# Altium PCB power_model.PcbDoc (part 2 of 2)
Units mm, origin at the board's own origin, x right, y up, seen from the top; angles counter-clockwise.
Board outline 133.22 x 76.2 mm, 2 copper layers (Top Layer, Bottom Layer); 223 components, 133 nets, 558 pads, 66 vias.
Unrouted connection lines stored in the file: 2.
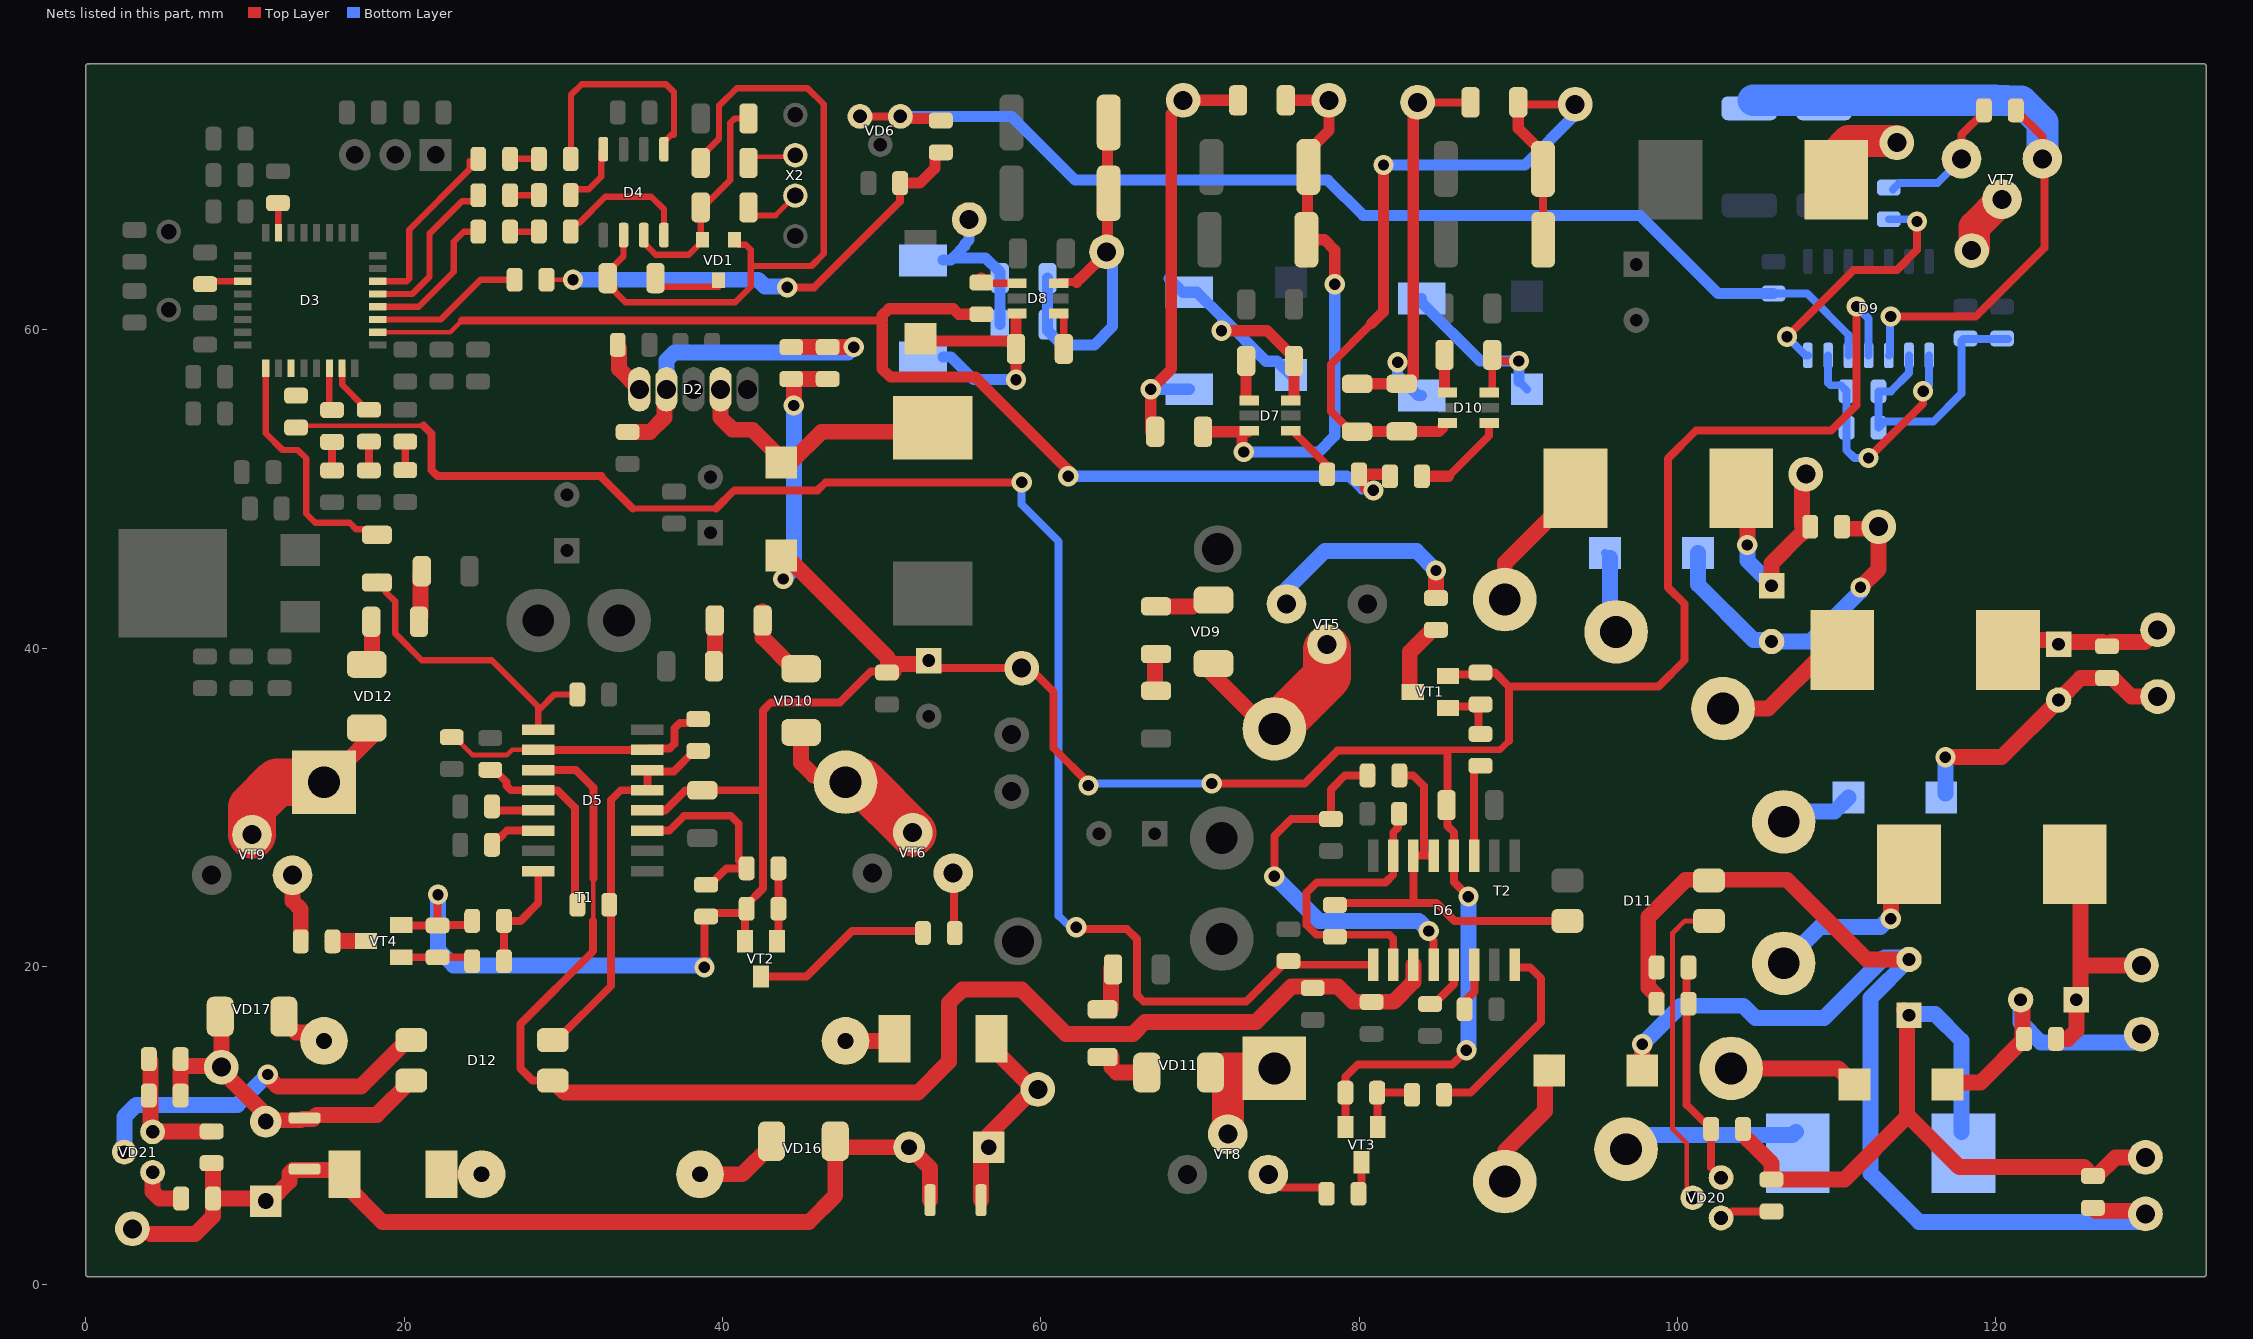
[diagram p2: the nets of this part, all layers, seen from the top]

## Via types
v1: diameter 1.27, hole 0.711, Top Layer to Bottom Layer, 63 vias
v2: diameter 1, hole 0.5, Top Layer to Bottom Layer, 3 vias

## Nets (pads, with @x,y where several pads share a name; then routed paths per layer and width w, separated by ;. In a path a pad name is that pad's centre, name@x,y a point inside that pad or via, vN(x,y) a via of type N, cw(c..) or ccw(c..) an arc to the next point about the centre after c; other vN are vias at no path point) (continued)
NetC15_1: C15.1 C21.2 C30.1 C31.1 D5.12 D6.12 D9.4 R13.2 R14.2 R43.2 R45.2 R46.2 R47.2 R48.2 R49.2 VD2.2 VT1.2 VT2.2 VT3.2 VT4.2 XT3.1 | length 223.4
  Top Layer w0.254: 42.466,31.067 42.545,30.988 ; VD2.2@43.688,45.822 43.688,44.466 v1(43.815,44.339) ; R14.2@44.323,56.912 R14.2@44.482,56.753 ; XT3.1@58.801,38.735 XT3.1@59.323,38.735 ; v1@62.941,31.667 v1@62.992,31.616 ; v1(62.992,31.369) v1@62.992,31.529 ; R48.2@79.137,12.065 R48.2@79.157,12.085 ; v1@62.992,31.529 63.025,31.496 63.112,31.496 v1@62.992,31.616 ; v1@62.992,31.529 v1@62.992,31.616
  Top Layer w0.3: v1@70.739,31.242 v1@70.993,31.496 ; VT1.2@85.619,38.148 85.725,38.148 VT1.2@85.931,38.354
  Top Layer w0.4: 85.558,33.607 88.852,33.607 89.408,34.163
  Top Layer w0.5: VT4.2@19.812,22.606 19.844,22.574 R49.2@22.098,22.574 ; v1(22.122,24.511) 22.098,24.487 22.098,22.606 24.019,22.606 R45.2@24.273,22.86 ; D5.12@35.282,29.797 36.401,29.797 37.671,31.067 C30.1@38.735,31.067 42.466,31.067 ; v1(38.862,19.939) 38.862,23.019 R43.2@38.973,23.13 39.211,23.368 41.106,23.368 41.402,23.664 VT2.2@41.402,21.574 ; R47.2@41.521,23.622 41.521,23.872 42.545,24.896 42.545,30.988 42.545,36.084 43.037,36.576 47.371,36.576 49.337,38.542 50.332,38.542 50.409,38.542 C21.2@50.739,38.542 ; C15.1@53.439,38.735 XT3.1@58.801,38.735 ; XT3.1@59.323,38.735 60.812,37.246 60.812,33.709 v1@62.992,31.529 ; v1@70.993,31.496 76.581,31.496 78.637,33.552 85.558,33.552 85.558,28.825 85.957,28.426 D6.12@85.957,26.961 85.957,25.295 v1(86.868,24.384) ; VT3.2@79.014,10.033 79.157,10.176 R48.2@79.157,11.811 ; R48.2@79.157,12.085 79.157,13.081 79.919,13.843 85.852,13.843 v1(86.741,14.732) ; VT1.2@85.931,38.354 R46.2@87.54,38.354 ; R46.2@87.63,38.465 88.535,38.465 89.408,37.592 ; 89.408,34.163 89.408,37.592 ; v1(111.252,61.468) 111.252,55.257 109.655,53.66 101.158,53.66 99.419,51.921 99.419,43.803 100.457,42.765 100.457,39.243 98.806,37.592 89.408,37.592
  Top Layer w1: VD2.2@43.942,45.822 50.409,39.355 50.409,38.542 C21.2@50.332,38.465 C21.2@50.332,38.542 ; R14.2@44.323,56.912 R13.2@46.609,56.912 ; v1(44.482,55.245) R14.2@44.482,56.753 ; C21.2@50.739,38.542 50.574,38.707 50.856,38.989 52.733,38.989 C15.1@52.959,39.215
  Bottom Layer w0.254: v1(62.992,31.369) 63.47,31.369 v1@63.597,31.496 ; v1(86.741,14.732) v1@86.868,14.859
  Bottom Layer w0.5: v1@63.597,31.496 v1(70.739,31.496) ; v1(111.252,61.468) 112.014,60.706 D9.4@112.014,58.391
  Bottom Layer w1: v1(22.122,24.511) 22.122,21.042 23.098,20.066 38.735,20.066 v1@38.862,20.193 ; v1(43.815,44.339) 44.482,45.006 v1(44.482,55.245) ; v1@86.868,14.859 v1(86.868,24.384)
NetC18_2: C18.2 R8.2 R18.2 | length 29.5
  Top Layer w0.3: R8.2@28.94,63.146 v1(30.607,63.146)
  Top Layer w0.5: v1(44.069,62.666) 45.76,62.666 51.165,68.072 C18.2@51.165,69.215
  Top Layer w0.7: C18.2@51.165,69.215 52.411,69.215 53.348,70.152 53.348,70.788 53.712,71.152 R18.2@53.721,71.152
  Bottom Layer w1: v1(30.607,63.146) 42.249,63.146 42.684,62.711 44.025,62.711 v1(44.069,62.666)
NetC26_2: C26.2 D5.5 | length 3
  Top Layer w0.5: C26.2@25.522,30.051 25.776,29.797 D5.5@28.424,29.797
NetC27_2: C27.2 D6.5 | length 3.2
  Top Layer w0.5: C27.2@84.455,17.637 84.705,17.637 85.957,18.889 D6.5@85.957,20.103
NetC32_2: C32.2 D5.1 R22.2 | length 19.3
  Top Layer w0.4: R22.2@18.288,44.474 18.403,44.474 18.839,44.038 18.839,43.518 19.431,42.926 19.431,40.918 21.106,39.243 25.503,39.243 28.424,36.322 28.424,36.068 ; D5.1@28.424,34.877 28.424,36.068 ; C32.2@30.877,37.084 29.44,37.084 28.551,36.195 28.424,36.068
NetC33_2: C33.2 D6.1 R24.2 | length 102.7
  Top Layer w0.254: v1(62.23,22.457) 62.506,22.457 v1@62.611,22.352
  Top Layer w0.3: R24.2@13.589,53.975 21.209,53.975
  Top Layer w0.4: 34.361,48.768 39.599,48.768
  Top Layer w0.5: R24.2@13.081,53.737 R24.2@13.208,53.864 R24.2@13.446,54.102 ; 21.209,53.975 21.717,53.467 21.717,51.181 22.088,50.81 32.385,50.81 ; 32.385,50.744 34.361,48.768 ; 39.599,48.768 40.742,49.911 45.974,49.911 46.482,50.419 v1(58.801,50.419) ; v1@62.611,22.352 65.405,22.352 66.04,21.717 66.04,18.209 66.469,17.78 72.898,17.78 75.221,20.103 D6.1@80.877,20.103
  Bottom Layer w0.5: v1(58.801,50.419) 58.801,49.022 61.126,46.697 61.126,23.18 v1@61.849,22.457
NetC34_1: C34.1 D7.6 L2.1 VD7.2 | length 19.1
  Top Layer w0.5: D7.6@75.723,55.56 D7.6@75.906,55.743
  Top Layer w0.7: v1(71.358,59.944) 74.222,59.944 75.906,58.26 C34.1@75.906,58.039 D7.6@75.906,55.743
  Bottom Layer w0.7: L2.1@68.056,63.23 68.929,62.357 L2.1@69.326,62.357 69.826,62.357 71.41,60.773 ; v1(71.358,59.944) 71.41,59.996 71.41,60.773 ; VD7.2@75.716,57.15 74.843,58.023 74.16,58.023 71.41,60.773
NetC34_2: C34.2 D7.1 | length 2.6
  Top Layer w0.5: D7.1@72.906,55.743 D7.1@73.089,55.56
  Top Layer w0.7: D7.1@72.906,55.743 C34.2@72.906,58.039
NetC35_1: C35.1 D8.6 L3.1 VD8.2 | length 15.4
  Top Layer w0.7: VD8.2@52.594,59.563 52.852,59.305 57.94,59.305 C35.1@58.444,58.801 ; v1(58.444,56.866) C35.1@58.444,58.801 ; D8.6@58.444,60.963 C35.1@58.444,58.801
  Bottom Layer w0.7: L3.1@53.848,58.293 54.348,58.293 55.775,56.866 v1(58.444,56.866)
NetC35_2: C35.2 D8.1 | length 2
  Top Layer w0.5: C35.2@61.444,58.801 D8.1@61.444,60.843
NetC36_1: C36.1 C38.1 L2.2 XT5.1 | length 27.8
  Top Layer w0.7: C36.1@67.191,53.594 66.913,53.594 v1(66.913,56.261) 68.199,57.547 68.199,73.549 68.818,74.168 68.818,74.295 XT5.1@68.945,74.422 C38.1@72.398,74.422
  Bottom Layer w0.7: v1(66.913,56.261) L2.2@69.326,56.261
NetC36_2: C36.2 C38.2 D7.3 R36.2 R38.2 XT6.1 | length 36
  Top Layer w0.7: C36.2@70.191,53.594 D7.3@73.03,53.594 ; v1@72.644,52.57 D7.3@72.644,53.435 ; v1(72.755,52.324) v1@72.755,52.681 ; C38.2@75.398,74.422 XT6.1@78.105,74.422 78.105,72.515 76.821,71.231 R38.2@76.821,70.231 76.757,70.168 76.757,65.722 R36.2@76.694,65.659 77.825,65.659 78.47,65.014 v1(78.47,62.865)
  Bottom Layer w0.7: v1(72.755,52.324) 77.47,52.324 78.47,53.324 v1(78.47,62.865)
NetC37_1: C37.1 C39.1 L3.2 XT7.1 | length 10.1
  Bottom Layer w0.7: L3.2@53.848,64.389 54.348,64.389 54.475,64.516 ; XT7.1@55.499,66.929 55.499,66.407 55.499,65.645 55.221,65.367 55.221,65.262 54.475,64.516 ; C39.1@57.428,60.325 C37.1@57.428,63.246 57.428,63.621 56.533,64.516 54.475,64.516
NetC37_2: C37.2 C39.2 D8.3 R37.2 R39.2 XT8.1 | length 25
  Top Layer w0.5: D8.3@61.193,62.992 62.256,62.992
  Top Layer w0.7: 62.256,62.992 62.479,63.215 62.501,63.215 64.159,64.873 XT8.1@64.135,64.897 64.2,64.962 64.2,72.961 R39.2@64.264,73.025
  Bottom Layer w0.7: C37.2@60.428,63.246 C39.2@60.428,60.325 60.428,59.95 61.323,59.055 63.373,59.055 64.516,60.198 64.516,64.516 XT8.1@64.135,64.897
NetC42_1: C42.1 D9.2 R55.2 R61.1 R62.1 | length 18.2
  Bottom Layer w0.5: D9.2@114.554,58.391 114.554,57.277 113.411,56.134 R55.2@112.633,56.134 C42.1@112.633,53.848 113.014,54.229 116.078,54.229 117.856,56.007 117.856,59.309 117.983,59.436 R62.1@120.777,59.436
NetC42_2: C42.2 D9.1 D9.6 R55.1 | length 16.4
  Top Layer w0.5: v1(112.014,51.943) 115.443,55.372 v1(115.443,56.134)
  Bottom Layer w0.5: D9.6@109.474,58.391 109.474,56.664 109.623,56.515 110.269,56.515 110.633,56.151 R55.1@110.633,56.134 C42.2@110.633,53.848 110.633,52.435 111.125,51.943 v1(112.014,51.943) ; v1(115.443,56.134) 115.824,56.515 D9.1@115.824,58.391
NetC43_1: C43.1 R59.2 | length 2.4
  Top Layer w1: R59.2@67.183,37.25 R59.2@67.246,37.314 ; R59.2@67.183,37.314 67.183,39.56 C43.1@67.246,39.624
NetC43_2: C43.2 VD9.2 | length 2.3
  Top Layer w1: C43.2@67.246,42.624 69.548,42.624
NetC44_1: C44.1 R60.2 | length 2.3
  Top Layer w1: R60.2@39.521,39.425 C44.1@39.521,41.735
NetC44_2: C44.2 VD10.2 | length 4.6
  Top Layer w1: C44.2@42.521,42.291 42.521,40.664 44.482,38.703 VD10.2@44.704,38.703
NetC45_1: C45.1 R56.2 | length 2.5
  Top Layer w1: R56.2@64.413,17.35 C45.1@64.413,19.86
NetC46_1: C46.1 R57.2 | length 3
  Top Layer w0.254: R57.2@20.931,41.656 R57.2@21.018,41.744 ; C46.1@21.018,44.743 C46.1@21.106,44.831
  Top Layer w1: R57.2@21.018,41.998 C46.1@21.018,44.743
NetC47_1: C47.1 D10.6 L5.1 VD13.2 | length 14.2
  Top Layer w0.5: D10.6@88.178,56.052 88.185,56.052 88.368,56.235 C47.1@88.368,58.42 88.749,58.039 v1(90.043,58.039)
  Bottom Layer w0.5: VD13.2@90.043,56.769 VD13.2@90.551,56.261
  Bottom Layer w0.7: L5.1@83.931,61.976 83.931,61.722 87.614,58.039 v1(90.043,58.039) VD13.2@90.043,56.769
NetC47_2: C47.2 D10.1 | length 2.2
  Top Layer w0.7: D10.1@85.368,56.235 C47.2@85.368,58.42
NetC48_1: C48.1 D9.5 R18.1 VD6.1 VD6.3 | length 71.7
  Top Layer w0.5: VD6.1@48.641,73.406 VD6.3@51.181,73.406
  Top Layer w0.7: VD6.3@51.181,73.406 51.308,73.279 53.594,73.279 R18.1@53.721,73.152
  Bottom Layer w0.5: C48.1@106.045,62.278 108.156,62.278 110.744,59.69 D9.5@110.744,58.391
  Bottom Layer w0.7: VD6.3@51.181,73.406 58.166,73.406 62.153,69.419 78.028,69.419 80.264,67.183 97.639,67.183 102.544,62.278 C48.1@106.045,62.278
NetC51_1: C51.1 C52.1 C53.1 L5.2 XT22.1 | length 27.2
  Top Layer w0.5: XT22.1@83.677,74.295 C51.1@87.003,74.295
  Top Layer w0.7: C53.1@79.883,56.602 79.891,56.61 82.669,56.61 C52.1@82.677,56.618 82.965,56.618 83.401,57.054 83.401,74.019 XT22.1@83.677,74.295
  Bottom Layer w0.7: v1(82.423,57.961) 82.423,57.16 83.703,55.88 L5.2@83.931,55.88
NetC51_2: C51.2 C52.2 C53.2 D10.3 R65.2 R67.2 XT23.1 | length 51.4
  Top Layer w0.5: C53.2@79.508,53.602 78.232,54.878 78.232,57.834 80.788,60.39 ; C51.2@90.003,74.295 90.13,74.168 XT23.1@93.583,74.168 ; R65.2@91.553,71.104 R65.2@91.553,70.104 91.561,70.096 91.561,65.667 R67.2@91.569,65.659
  Top Layer w0.7: C53.2@79.508,53.602 C53.2@79.883,53.602 79.899,53.618 C52.2@82.677,53.618 85.024,53.618 D10.3@85.258,53.852 ; 80.788,60.39 81.534,61.136 v1(81.534,70.358) ; C51.2@90.003,74.295 90.003,72.654 R65.2@91.553,71.104
  Bottom Layer w0.5: XT23.1@93.583,73.517 XT23.1@93.583,74.168
  Bottom Layer w0.7: v1(81.534,70.358) 90.424,70.358 XT23.1@93.583,73.517
NetC54_1: C54.1 C64.2 VD14.1 XT11.1 | length 17.6
  Top Layer w1: VD14.1@117.602,12.7 119.047,12.7 C54.1@121.793,15.446 121.68,15.559 121.68,17.794 C64.2@121.567,17.907
  Bottom Layer w1: C64.2@121.567,17.907 121.567,16.482 122.831,15.218 128.629,15.218 XT11.1@129.159,15.748
NetC54_2: C54.2 C64.1 L7.2 XT17.1 | length 15.7
  Top Layer w1: C54.2@123.793,15.446 124.539,15.446 125.067,15.974 C64.1@125.067,17.907 125.333,18.173 125.333,20.193 ; L7.2@124.142,25.717 125.333,24.527 125.333,20.193 ; XT17.1@129.159,20.066 125.46,20.066 125.333,20.193
NetC55_1: C55.1 C60.2 C61.2 D11.2 R70.2 VD15.1 XT13.1 | length 82
  Top Layer w0.5: C55.1@125.861,4.826 C55.1@126.111,4.826 C55.1@126.301,4.635 ; XT13.1@129.222,4.635 XT13.1@129.413,4.445
  Top Layer w1: VD15.1@97.79,13.843 v1(97.79,15.113) ; R70.2@98.695,18.161 98.171,18.685 98.171,23.098 100.516,25.443 D11.2@102.024,25.443 ; D11.2@101.981,25.4 D11.2@102.024,25.443 ; C60.2@113.776,20.435 111.899,20.435 106.891,25.443 D11.2@102.024,25.443 ; C55.1@126.301,4.635 XT13.1@129.222,4.635
  Bottom Layer w1: v1(97.79,15.113) 100.203,17.526 104.14,17.526 104.902,16.764 109.22,16.764 113.03,20.574 114.693,20.574 C60.2@114.554,20.435 112.141,18.022 112.141,6.985 115.189,3.937 128.905,3.937 XT13.1@129.413,4.445
NetC55_2: C55.2 C60.1 L6.2 R72.1 R74.2 XT12.1 | length 44.7
  Top Layer w1: R72.1@104.45,9.088 105.918,7.62 105.918,7.183 ; R74.2@105.918,6.604 110.49,6.604 114.427,10.541 ; C60.1@114.229,17.26 C60.1@114.554,16.935 ; C60.1@114.427,16.157 114.427,10.541 ; XT12.1@129.413,8.001 127.536,8.001 126.361,6.826 C55.2@126.111,6.826 125.555,7.382 117.713,7.382 114.554,10.541 114.427,10.541
  Bottom Layer w1: C60.1@115.288,17.018 116.183,17.018 117.856,15.345 L6.2@117.856,9.604
NetC56_1: C56.1 C57.2 C62.1 C65.2 L9.2 R73.1 R75.2 VD16.1 XT15.1 | length 62.5
  Top Layer w1: 4.064,3.175 6.858,3.175 7.985,4.302 R75.2@7.985,5.413 ; R73.1@7.901,7.636 7.985,7.552 R75.2@7.985,5.413 ; C56.1@53.046,5.311 53.046,7.319 C65.2@51.729,8.636 47.466,8.636 VD16.1@47.085,9.017 47.085,5.588 45.434,3.937 18.629,3.937 16.129,6.437 16.129,6.937 15.85,7.216 13.015,7.216 12.795,6.997 12.795,6.485 11.557,5.247 11.391,5.413 R75.2@7.985,5.413
NetC56_2: C56.2 C65.1 L8.2 XT14.1 | length 12.6
  Top Layer w1: C56.2@56.246,5.311 56.246,8.153 C65.1@56.729,8.636 56.729,9.437 59.563,12.271 59.563,12.279 56.896,14.946 L8.2@56.896,15.446
NetC57_1: C57.1 C62.2 C63.2 D12.2 R71.2 VD17.1 XT16.1 | length 22.9
  Top Layer w1: R71.2@5.953,11.89 5.953,13.735 C63.2@5.953,14.099 ; C63.2@5.953,14.176 C63.2@5.953,14.099 ; VD17.1@8.441,16.843 8.509,16.774 XT16.1@8.509,13.668 ; D12.2@20.447,12.827 18.288,10.668 14.516,10.668 14.264,10.417 13.614,10.417 13.53,10.332 11.642,10.332 11.557,10.247 11.557,10.433 8.509,13.481 XT16.1@8.509,13.668 ; C63.2@5.953,14.099 6.317,13.735 8.441,13.735 XT16.1@8.509,13.668
NetC58_1: C58.1 C66.2 VD18.1 XT20.1 | length 21.1
  Top Layer w1: C58.1@110.738,47.498 112.268,47.498 112.649,47.117 112.649,44.958 v1(111.506,43.815)
  Bottom Layer w1: VD18.1@101.295,45.974 101.295,43.993 104.775,40.513 105.886,40.513 C66.2@105.985,40.414 ; C66.2@105.918,40.414 C66.2@105.985,40.414 ; v1(111.506,43.815) 111.506,43.561 108.359,40.414 C66.2@105.985,40.414
NetC58_2: C58.2 C66.1 L11.2 XT19.1 | length 15.2
  Top Layer w0.254: L11.2@104.013,50.038 L11.2@104.394,49.657
  Top Layer w1: v1(104.394,46.482) L11.2@104.394,49.657 ; C66.1@105.918,43.914 105.918,45.323 107.7,47.105 C58.2@108.069,47.363 ; XT19.1@108.077,50.546 107.823,50.546 107.823,47.736 C58.2@108.207,47.483
  Bottom Layer w1: v1(104.394,46.482) 104.394,45.505 C66.1@106.211,43.688
NetC59_1: C59.1 C67.2 VD19.1 XT18.1 | length 18.2
  Top Layer w1: v1(116.84,33.147) 120.364,33.147 C67.2@123.952,36.735 125.333,38.116 C59.1@127,38.116 127.365,38.116 128.524,36.957 XT18.1@130.175,36.957
  Bottom Layer w1: VD19.1@116.84,30.861 v1(116.84,33.147)
NetC59_2: C59.2 C67.1 L10.2 XT21.1 | length 11.8
  Top Layer w1: L10.2@119.507,39.592 120.428,40.513 123.674,40.513 C67.1@123.952,40.235 124.103,40.386 126.73,40.386 C59.2@127,40.116 127.27,40.386 129.394,40.386 130.156,41.148 XT21.1@130.175,41.148
NetC61_1: C61.1 R70.1 R72.2 VD20.1 | length 15.1
  Top Layer w0.5: C61.1@100.584,20.447 100.584,20.193 100.584,19.939 100.584,18.161 100.584,11.303 102.124,9.763 102.124,7.35 VD20.1@102.743,6.731 ; C61.1@100.711,19.939 100.711,20.193 C61.1@100.711,20.447
NetC63_1: C63.1 R71.1 R73.2 VD21.1 | length 8.3
  Top Layer w1: C63.1@3.953,14.176 4.072,14.057 4.072,9.906 4.358,9.62 7.885,9.62 R73.2@7.901,9.636
NetD2_1: D2.1 R1.1 | length 3.1
  Top Layer w1: R1.1@33.504,58.833 33.504,57.535 D2.1@34.778,56.261
NetD2_2: D2.2 R9.2 R13.1 R14.1 | length 22.4
  Top Layer w1: R9.2@34.036,53.578 35.448,53.578 36.35,54.48 36.35,56.133 D2.2@36.478,56.261 ; R14.1@44.323,58.912 R13.1@46.609,58.912 46.617,58.92 46.625,58.912 v1(48.244,58.912)
  Bottom Layer w1: D2.2@36.478,56.261 36.478,58.068 36.981,58.571 45.236,58.571 47.903,58.571 v1(48.244,58.912)
NetD2_4: D2.4 L1.2 VD2.1 | length 17
  Top Layer w1: D2.4@39.878,56.261 39.878,54.483 40.64,53.721 41.885,53.721 43.942,51.664 44.298,51.664 46.228,53.594 51.697,53.594 52.332,54.229 L1.2@52.832,54.229
NetD3_3: D3.3 R3.1 | length 2.4
  Top Layer w0.4: R3.1@7.493,62.865 7.677,63.049 D3.3@9.847,63.049
NetD3_9: D3.9 R22.1 | length 15.6
  Top Layer w0.4: D3.9@11.297,57.599 11.297,53.505 12.351,52.451 13.314,52.451 13.843,51.922 13.843,48.438 14.402,47.879 16.57,47.879 16.975,47.474 R22.1@18.288,47.474
NetD3_11: D3.11 R24.1
NetD3_14: D3.14 R11.1 | length 2.5
  Top Layer w0.4: D3.14@15.297,57.599 15.297,55.325 R11.1@15.47,55.152
NetD3_15: D3.15 R12.1 | length 3.3
  Top Layer w0.4: D3.15@16.097,57.599 16.097,56.547 17.492,55.152 R12.1@17.78,55.152
NetD3_18: D3.18 R25.1 R27.1 R54.1 | length 79.6
  Top Layer w0.3: D3.18@18.347,59.849 22.892,59.849 23.622,60.579
  Top Layer w0.5: 23.622,60.579 50.038,60.579 ; v1(61.722,50.8) v1@61.722,51.181 ; R25.1@80.291,50.63 80.291,50.032 80.412,49.911 v1(80.899,49.911)
  Top Layer w0.7: 50.038,60.325 50.038,57.531 50.546,57.023 55.88,57.023 v1@61.722,51.181 ; 50.038,60.579 50.038,60.905 50.452,61.319 54.505,61.319 54.848,60.976 R27.1@56.261,60.976 ; R25.1@80.291,50.63 R25.1@79.994,50.927 81.82,50.927 R54.1@81.947,50.8
  Bottom Layer w0.5: 79.248,50.8 80.137,49.911 v1(80.899,49.911)
  Bottom Layer w0.7: v1(61.722,50.8) 79.248,50.8
NetD3_19: D3.19 R8.1 | length 9.6
  Top Layer w0.4: D3.19@18.347,60.649 22.295,60.649 24.792,63.146 R8.1@26.94,63.146
NetD3_20: D3.20 R15.2 | length 9.4
  Top Layer w0.4: D3.20@18.347,61.449 20.909,61.449 23.114,63.654 23.114,65.532 23.749,66.167 R15.2@24.654,66.167
NetD3_21: D3.21 R16.2 | length 10.5
  Top Layer w0.4: D3.21@18.347,62.249 20.505,62.249 21.59,63.334 21.59,66.04 23.63,68.08 24.29,68.08 24.654,68.444 R16.2@24.654,68.453
NetD3_22: D3.22 R17.2 | length 11.6
  Top Layer w0.4: D3.22@18.347,63.049 20.171,63.049 20.32,63.198 20.32,66.294 24.106,70.08 24.106,70.59 24.505,70.59 R17.2@24.654,70.739
NetD3_31: D3.31 R2.1 | length 1.9
  Top Layer w0.4: R2.1@12.065,67.961 12.097,67.929 D3.31@12.097,66.099
NetD4_1: D4.1 R20.1 | length 14.9
  Top Layer w0.4: R20.1@30.464,70.739 30.48,70.755 30.48,74.765 31.153,75.438 36.449,75.438 36.957,74.93 36.957,72.263 36.771,72.263 36.322,71.814 D4.1@36.322,71.352
NetD4_4: D4.4 R19.1 | length 4.2
  Top Layer w0.4: R19.1@30.464,68.461 30.464,68.47 30.828,68.834 31.6,68.834 32.385,69.619 32.385,71.225 D4.4@32.512,71.352
NetD4_6: D4.6 R4.2 R5.1 VD1.1 | length 42.8
  Top Layer w0.4: D4.6@33.782,65.952 33.782,64.613 32.79,63.621 R5.1@32.79,63.246 32.79,63.146 33.226,62.71 33.226,62.405 33.909,61.722 40.799,61.722 41.783,62.706 41.783,64.008 ; R4.2@38.632,70.485 38.632,70.86 39.781,72.009 39.781,74.071 40.894,75.184 45.339,75.184 46.355,74.168 46.355,64.77 45.593,64.008 41.783,64.008 ; VD1.1@40.767,65.65 40.767,65.574 40.99,65.351 41.472,65.351 41.783,65.04 41.783,64.008
NetD4_7: D4.7 R6.1 R7.1 VD1.2 | length 14.2
  Top Layer w0.4: D4.7@35.052,65.952 35.052,65.477 35.806,64.723 37.883,64.723 38.632,65.471 38.632,67.183 38.632,67.558 40.489,69.415 40.489,73.001 40.767,73.279 R7.1@41.632,73.279
NetD4_8: D4.8 R21.1 | length 8.8
  Top Layer w0.4: R21.1@30.464,66.176 30.464,66.36 30.828,66.723 31.011,66.723 32.644,68.357 35.529,68.357 36.322,67.564 D4.8@36.322,65.952
NetD5_2: D5.2 D5.15 R28.2 R30.1 | length 17
  Top Layer w0.3: R28.2@23.17,34.401 24.297,33.274 26.448,33.274 26.781,33.607 D5.2@27.94,33.607
  Top Layer w0.5: R28.2@22.987,34.401 R28.2@23.17,34.401 ; D5.2@28.424,33.607 D5.15@35.282,33.607 35.369,33.694 36.679,33.694 36.973,33.988 36.973,34.941 37.338,35.306 38.243,35.306 R30.1@38.481,35.544
NetD5_3: D5.3 D6.3 D12.3 R68.2 R69.2 | length 88.9
  Top Layer w0.3: 31.885,22.868 31.885,25.519
  Top Layer w0.5: D5.3@28.424,32.337 30.782,32.337 31.885,31.234 31.885,25.519 ; D12.3@28.94,12.827 28.067,12.827 27.305,13.589 27.305,16.383 31.877,20.955 31.877,22.86
  Top Layer w1: D12.3@29.337,12.827 30.099,12.065 52.284,12.065 54.229,14.01 54.229,17.701 55.07,18.542 58.801,18.542 61.595,15.748 65.786,15.748 66.548,16.51 73.406,16.51 ; 73.533,16.51 75.766,18.743 78.666,18.743 79.629,17.78 82.169,17.78 83.417,19.028 D6.3@83.417,20.103
NetD5_4: D5.4 R31.1 R32.1 | length 12.7
  Top Layer w0.5: R32.1@25.411,32.353 25.661,32.353 26.416,31.597 26.416,31.369 26.718,31.067 D5.4@28.424,31.067 29.639,31.067 30.734,29.972 30.734,24.146 R31.1@31.004,23.876
NetD5_6: D5.6 R23.2 | length 3.4
  Top Layer w0.5: R23.2@25.522,27.638 25.522,27.821 25.767,28.067 25.99,28.067 26.45,28.527 D5.6@28.424,28.527
NetD5_8: D5.8 R44.1 R45.1 | length 7.2
  Top Layer w0.5: R44.1@26.273,20.32 R45.1@26.273,22.86 27.305,22.86 28.424,23.979 D5.8@28.424,25.987
NetD5_11: D5.11 R42.1 R43.1 | length 12.3
  Top Layer w0.5: D5.11@35.282,28.527 36.655,28.527 37.592,29.464 40.513,29.464 41.021,28.956 41.021,26.662 R42.1@41.521,26.162 40.255,26.162 39.223,25.13 R43.1@38.973,25.13
NetD5_13: D5.13 D5.14 D12.4 R30.2 R31.2 | length 24.3
  Top Layer w0.5: D12.4@29.337,15.367 29.587,15.367 33.004,18.784 33.004,30.464 33.607,31.067 D5.13@35.282,31.067 D5.14@35.282,32.337 35.361,32.258 36.945,32.258 38.231,33.544 R30.2@38.481,33.544
NetD6_2: D6.2 D6.15 R29.2 R33.1 | length 19.4
  Top Layer w0.5: D6.2@82.147,20.103 82.147,21.739 81.899,21.987 78.74,21.987 77.321,21.987 76.708,22.6 76.708,24.638 77.343,25.273 81.661,25.273 82.147,25.759 D6.15@82.147,26.961 82.147,28.426 82.446,28.725 82.446,29.376 R29.2@82.661,29.591
NetD6_4: D6.4 R34.1 R35.1 | length 24.7
  Top Layer w0.254: v1@84.381,21.918 v1(84.381,22.225)
  Top Layer w0.5: v1(74.676,25.654) 74.676,28.194 75.739,29.257 R35.1@78.232,29.257 78.232,31.115 79.121,32.004 R34.1@80.534,32.004 R34.1@80.788,32.004 ; v1@84.381,21.918 84.687,21.612 D6.4@84.687,20.103
  Bottom Layer w1: v1(74.676,25.654) 77.47,22.86 83.746,22.86 v1(84.381,22.225)
NetD6_6: D6.6 R26.2 | length 3
  Top Layer w0.5: R26.2@86.503,17.399 86.503,17.669 87.249,18.415 87.249,20.082 D6.6@87.227,20.103
NetD6_8: D6.8 R41.1 | length 12.8
  Top Layer w0.5: R41.1@85.328,11.811 85.582,12.065 86.995,12.065 91.44,16.51 91.44,19.237 90.738,19.939 89.932,19.939 D6.8@89.767,20.103
NetD6_11: D6.11 R40.1 | length 5.2
  Top Layer w0.5: D6.11@87.227,26.961 R40.1@87.227,32.188
NetD6_13: D6.13 D6.14 D11.4 R33.2 R34.2 | length 24.7
  Top Layer w0.5: R33.2@78.74,23.987 83.417,23.987 84.876,23.987 86.003,22.86 D11.4@93.091,22.86 ; R34.2@82.788,32.004 83.391,32.004 84.074,31.321 84.074,27.069 ; 83.417,24.13 D6.14@83.417,26.961 84.074,26.961 D6.13@84.687,26.961
NetD7_4: D7.4 R25.2 | length 3.3
  Top Layer w0.5: D7.4@75.803,53.665 R25.2@78.121,51.347
NetD8_4: D8.4 R27.2 | length 2
  Top Layer w0.5: R27.2@56.581,62.926 D8.4@58.108,62.926
  Top Layer w0.7: R27.2@56.261,63.246 R27.2@56.581,62.926
NetD9_3: D9.3 R63.2 R64.1 R66.1 VT7.3 | length 44.3
  Top Layer w0.5: v1(113.411,60.833) 118.745,60.833 123.063,65.151 VT7.3@123.063,70.485 ; R63.2@121.285,74.041 121.285,73.791 122.936,72.14 VT7.3@122.936,70.739
  Bottom Layer w0.5: D9.3@113.284,58.391 113.347,58.454 113.347,60.77 v1(113.411,60.833)
  Bottom Layer w2: R64.1@104.775,74.424 119.965,74.424 121.602,74.359 122.936,73.025 VT7.3@122.936,70.739
NetD9_7: D9.7 R58.1 | length 15.8
  Top Layer w0.5: v1(106.89,59.563) 111.081,63.754 113.792,63.754 115.062,65.024 v1(115.062,66.802)
  Bottom Layer w0.5: v1(106.89,59.563) 108.062,58.391 D9.7@108.204,58.391 ; R58.1@113.284,66.945 114.919,66.945 v1(115.062,66.802)
NetD10_4: D10.4 R54.2 | length 6.1
  Top Layer w0.5: 85.626,50.8 88.178,53.352 D10.4@88.178,54.152
  Top Layer w0.7: R54.2@83.947,50.8 85.626,50.8
NetD11_1: D11.1 VD20.2 | length 19.3
  Top Layer w0.3: VD20.2@100.584,5.842 100.584,8.874 99.695,9.763 99.695,22.098 100.457,22.86 D11.1@101.473,22.86
  Top Layer w0.5: VD20.2@100.584,5.842 VD20.2@100.965,5.461
NetD12_1: D12.1 VD21.2 | length 22.9
  Top Layer w1: v1(11.43,13.208) 11.43,13.081 12.065,12.446 17.276,12.446 20.197,15.367 D12.1@20.447,15.367
  Bottom Layer w1: VD21.2@2.413,8.334 2.413,10.541 3.175,11.303 9.525,11.303 v1(11.43,13.208)
NetL4_2: L4.2 XT9.1 | length 4.1
  Top Layer w2: L4.2@109.982,71.104 110.738,71.86 XT9.1@113.792,71.86
NetL6_1: L6.1 T2.11 | length 11.1
  Bottom Layer w1: T2.11@96.774,8.509 97.663,9.398 107.236,9.398 L6.1@107.442,9.604
NetL7_1: L7.1 T2.9 | length 10.7
  Top Layer w1: v1(113.411,22.987) 113.411,24.463 L7.1@114.427,25.479
  Bottom Layer w1: T2.9@106.68,20.193 108.966,22.479 112.776,22.479 v1@113.284,22.987
NetL8_1: L8.1 T1.5 | length 3.1
  Top Layer w0.5: L8.1@50.673,15.319 L8.1@50.8,15.446
  Top Layer w1: T1.5@47.728,15.319 L8.1@50.673,15.319
NetL9_1: L9.1 T1.7 | length 2.6
  Top Layer w0.5: L9.1@22.225,6.937 T1.7@24.868,6.937
NetL10_1: L10.1 T2.7 | length 7.6
  Top Layer w1: T2.7@102.87,36.195 105.696,36.195 L10.1@109.093,39.592
NetL11_1: L11.1 T2.5 | length 7.8
  Top Layer w1: T2.5@89.154,43.053 89.154,45.339 92.456,48.641 L11.1@92.456,49.53
NetR4_1: R4.1 X2.3 | length 3.4
  Top Layer w0.3: R4.1@42.068,70.868 44.476,70.868 X2.3@44.577,70.969
  Top Layer w0.4: R4.1@41.632,70.231 41.632,70.432 R4.1@42.068,70.868
NetR5_2: R5.2 VD1.3 | length 4.2
  Top Layer w0.4: R5.2@35.79,63.246 35.79,63.146 36.226,62.71 VD1.3@39.751,62.71
NetR6_2: R6.2 X2.2 | length 3.5
  Top Layer w0.3: 43.331,67.183 X2.2@44.577,68.429
  Top Layer w0.4: R6.2@41.632,67.183 43.331,67.183
NetR10_2: R10.2 VD3.1 | length 1.7
  Top Layer w0.5: VD3.1@20.066,51.419 R10.2@20.066,53.152
NetR11_2: R11.2 VD4.1 | length 1.7
  Top Layer w0.5: VD4.1@15.47,51.419 R11.2@15.47,53.152
NetR12_2: R12.2 VD5.1 | length 1.7
  Top Layer w0.5: VD5.1@17.78,51.419 R12.2@17.78,53.152
NetR15_1: R15.1 R21.2 | length 1.8
  Top Layer w0.4: R15.1@26.654,66.167 28.455,66.167 R21.2@28.464,66.176
NetR16_1: R16.1 R19.2 | length 1.8
  Top Layer w0.4: R16.1@26.654,68.453 28.456,68.453 R19.2@28.464,68.461
NetR17_1: R17.1 R20.2 | length 1.8
  Top Layer w0.4: R17.1@26.654,70.739 R20.2@28.464,70.739
NetR40_2: R40.2 R46.1 VT1.1 | length 3.6
  Top Layer w0.5: VT1.1@85.619,36.116 85.825,36.322 87.143,36.322 87.503,35.962 R40.2@87.503,34.528
NetR41_2: R41.2 R48.1 VT3.1 | length 4.2
  Top Layer w0.5: VT3.1@81.046,10.033 81.157,10.144 R48.1@81.157,12.192 ; R48.1@81.137,12.446 81.518,12.065 R41.2@82.947,12.065
NetR42_2: R42.2 R47.1 VT2.1 | length 4.6
  Top Layer w0.5: VT2.1@43.434,21.574 43.521,21.661 R47.1@43.521,23.622 R42.2@43.521,26.162
NetR44_2: R44.2 R49.1 VT4.1 | length 4.6
  Top Layer w0.5: VT4.1@19.812,20.574 R49.1@22.098,20.574 24.019,20.574 R44.2@24.273,20.32
NetR50_1: R50.1 VT3.3 | length 2.1
  Top Layer w0.5: R50.1@79.883,5.918 80.153,6.188 VT3.3@80.153,7.899
NetR50_2: R50.2 VT8.1 | length 3.7
  Top Layer w0.5: VT8.1@74.295,6.921 75.12,6.096 R50.2@77.695,6.096
NetR51_1: R51.1 VT1.3 | length 4.8
  Top Layer w1: VT1.3@83.371,37.243 83.185,37.429 83.185,39.747 84.586,41.148 R51.1@84.836,41.148
NetR51_2: R51.2 VT5.1 | length 13.6
  Top Layer w1: VT5.1@75.438,42.775 VT5.1@75.438,43.307 ; R51.2@84.836,43.585 v1(84.836,44.871)
  Bottom Layer w1: VT5.1@75.438,42.775 75.438,43.688 77.851,46.101 83.606,46.101 v1(84.836,44.871)
NetR52_1: R52.1 VT4.3 | length 2.1
  Top Layer w1: R52.1@15.502,21.574 15.518,21.59 VT4.3@17.602,21.59
NetR52_2: R52.2 VT9.1 | length 4.4
  Top Layer w1: VT9.1@12.981,25.733 12.981,24.107 13.502,23.586 R52.2@13.502,21.574
NetR53_1: R53.1 VT2.3 | length 11.4
  Top Layer w0.5: VT2.3@42.418,19.364 45.272,19.364 48.133,22.225 52.467,22.225 R53.1@52.594,22.098
NetR53_2: R53.2 VT6.1 | length 3.8
  Top Layer w0.5: VT6.1@54.494,25.86 54.544,25.81 54.544,22.148 R53.2@54.594,22.098
NetR56_1: R56.1 VD11.1 | length 3.1
  Top Layer w1: R56.1@64.444,14.303 64.444,13.661 64.77,13.335 66.453,13.335 VD11.1@66.707,13.589
NetR57_1: R57.1 VD12.1 | length 2.8
  Top Layer w1: VD12.1@17.966,38.703 R57.1@17.966,41.47
NetR58_2: R58.2 R63.1 VT7.1 | length 9
  Top Layer w0.5: VT7.1@117.856,70.739 117.856,72.263 119.285,73.692 R63.1@119.285,74.041
  Bottom Layer w0.5: R58.2@113.538,68.818 113.935,69.215 116.332,69.215 VT7.1@117.856,70.739
NetR74_1: R74.1 VD20.3 | length 3.5
  Top Layer w0.5: VD20.3@102.743,3.937 103.41,4.604 R74.1@105.918,4.604
NetR75_1: R75.1 VD21.3 | length 3.2
  Top Layer w1: VD21.3@4.191,7.064 4.191,5.842 4.62,5.413 R75.1@5.985,5.413
NetT1_1: T1.1 VD12.2 VT9.2 | length 12.8
  Top Layer w1: T1.1@14.248,30.861 T1.1@14.962,31.575 15.875,32.488 15.875,32.358 VD12.2@18.347,34.83
  Top Layer w3: VT9.2@10.441,28.273 10.441,29.999 12.017,31.575 T1.1@14.962,31.575
NetT1_4: T1.4 VD10.1 VT6.2 | length 9.1
  Top Layer w0.5: VD10.1@44.704,34.703 VD10.1@44.943,34.703 ; T1.4@47.728,31.575 T1.4@47.728,31.918
  Top Layer w1: VD10.1@44.943,34.703 44.943,32.781 45.72,32.004
  Top Layer w3: T1.4@47.728,31.575 48.779,31.575 VT6.2@51.954,28.4
NetT1_6: T1.6 VD16.2 | length 5.5
  Top Layer w1: T1.6@38.584,6.937 41.244,6.937 43.085,8.778 VD16.2@43.085,9.017
NetT1_8: T1.8 VD17.2 | length 3.3
  Top Layer w1: VD17.2@12.441,16.843 12.441,16.604 13.201,15.844 14.436,15.844 T1.8@14.962,15.319
NetT2_1: T2.1 VD11.2 VT8.2 | length 7
  Top Layer w2: 71.628,13.589 T2.1@74.676,13.589 ; VT8.2@71.755,9.461 71.755,13.462
NetT2_4: T2.4 VD9.1 VT5.2 | length 12.8
  Top Layer w1: VD9.1@70.18,39.021 VD9.1@70.58,39.021 ; VD9.1@70.509,38.632 74.089,35.052 74.549,35.052 T2.4@74.676,34.925
  Top Layer w2: VT5.2@77.978,39.918 VT5.2@77.978,40.235
  Top Layer w3: T2.4@74.676,34.925 77.978,38.227 VT5.2@77.978,39.918
NetT2_6: T2.6 VD18.2 | length 5.2
  Bottom Layer w0.5: VD18.2@95.453,45.974 VD18.2@95.758,45.669
  Bottom Layer w1: VD18.2@95.758,45.669 95.758,41.417 T2.6@96.154,41.021
NetT2_8: T2.8 VD19.2 | length 4.7
  Bottom Layer w1: T2.8@106.68,29.083 107.331,29.734 109.871,29.734 VD19.2@110.744,30.607
NetT2_10: T2.10 VD14.2 | length 8.2
  Top Layer w1: T2.10@103.378,13.589 110.109,13.589 VD14.2@111.125,12.573
NetT2_12: T2.12 VD15.2 | length 8.8
  Top Layer w1: T2.12@89.154,6.477 89.154,8.382 91.694,10.922 VD15.2@91.694,13.97 ; VD15.2@91.948,13.795 VD15.2@92.154,13.589
NetVT7_2: VT7.2 XT10.1 | length 4.1
  Top Layer w2: XT10.1@118.491,64.979 118.649,65.137 118.649,66.452 VT7.2@120.396,68.199 VT7.2@120.459,68.263
pads on no net: D3.6 D3.7 D3.8 D3.10 D3.12 D3.13 D3.25 D3.26 D3.27 D3.28 D3.29 D3.30 D4.5 D9.8 D9.9 D9.10 D9.12 D9.13 D9.14 D11.3 VD9. VD10. VD11. VD12. VD16. VD17. X2.4
copper on no net: | length 1.9
  Top Layer w0.4: 12.897,57.599 12.897,56.826 13.208,56.515 13.208,55.864

## Polygon pours and split planes (outlines as drawn)
NetC1_1 on Bottom Layer "Bottom Layer-NetC1_1" (solid, pour order 6): 67.437,3.265 68.326,2.376 107.95,2.376 110.744,5.17 110.744,48.768 77.216,48.768 67.652,39.204
NetC1_1 on Bottom Layer "Bottom Layer-No Net 1" (solid, remove dead copper, pour order 2): 1.778,21.336 60.071,21.336 60.071,45.846 56.423,49.493 1.778,49.493
NetC1_1 on Bottom Layer "Bottom Layer-No Net" (solid, pour order 0): 6.715,75.311 1.778,69.669 1.778,49.493 1.868,49.403 17.364,49.403 31.902,49.403 31.902,57.404 34.544,59.309 45.194,59.309 45.974,60.452 45.974,73.152 43.815,75.311
no net on Top Layer "Top Layer-No Net" (solid, remove dead copper, pour order 4): 44.831,75.009

## Silkscreen, mask and mechanical layers (free items; w line width, h text height)
Mechanical 1:
  lines w0.254: 0.127,76.581 0.127,0.635 133.096,0.635 133.096,76.581 0.254,76.581